# Altium PCB HIL_project.PcbDoc (part 3 of 3)
Units mm, origin at the board's own origin, x right, y up, seen from the top; angles counter-clockwise.
Board outline 165 x 120 mm, 2 copper layers (Top Layer, Bottom Layer); 116 components, 232 nets, 732 pads, 1218 vias.
Unrouted connection lines stored in the file: 107.
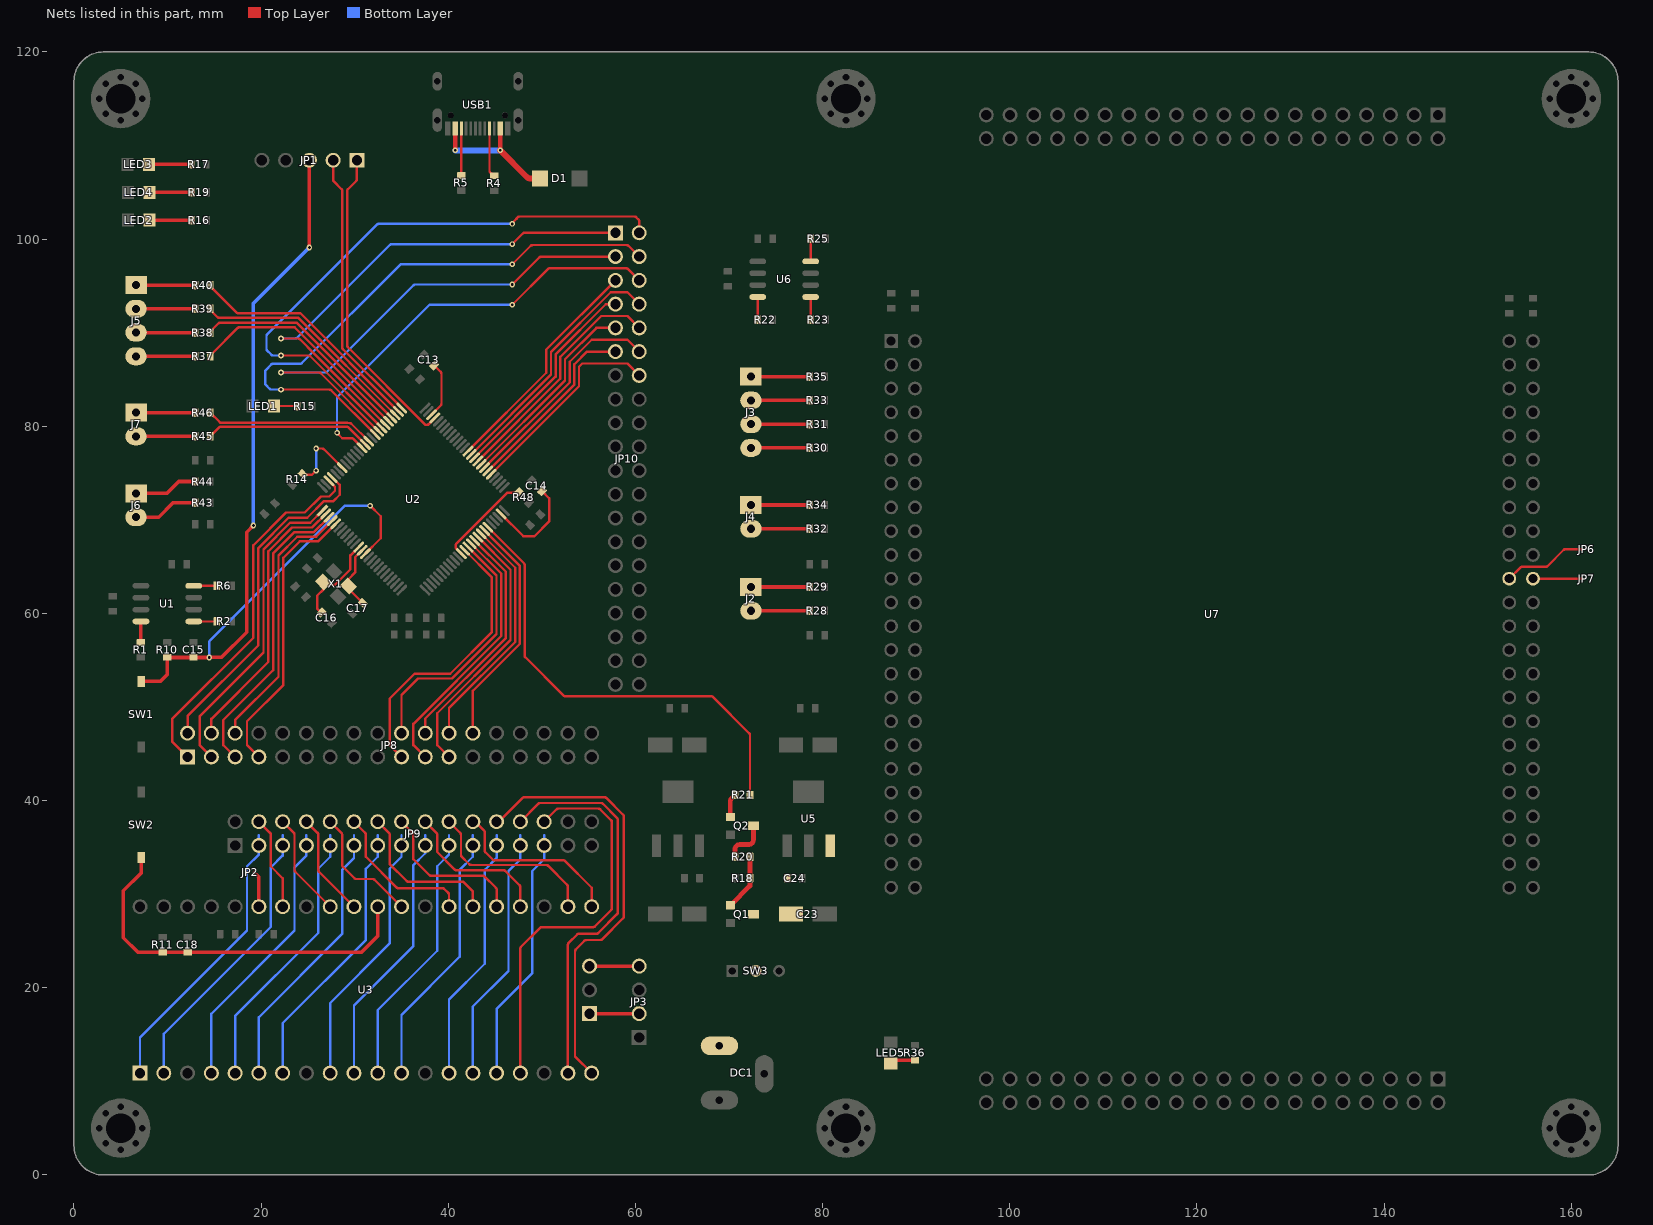
[diagram p3: the nets of this part, all layers, seen from the top]

## Via types
v1: diameter 0.6, hole 0.3, Top Layer to Bottom Layer, tented both sides, 1218 vias

## Nets (pads, with @x,y where several pads share a name; then routed paths per layer and width w, separated by ;. In a path a pad name is that pad's centre, name@x,y a point inside that pad or via, vN(x,y) a via of type N, cw(c..) or ccw(c..) an arc to the next point about the centre after c; other vN are vias at no path point) (continued)
HIL_PD0: JP10.1 U2.81 | length 55.3
  Top Layer w0.254: v1(22.123,89.383) 23.96,89.383 cw(c23.96,89.129) 24.14,89.308 25.765,87.683 U2.81@33.27,80.178 ; v1(46.838,99.466) 47.968,100.597 cw(c48.147,100.417) 47.995,100.62 cw(c48.147,100.417) 48.147,100.671 JP10.1@57.865,100.671
  Bottom Layer w0.254: v1(22.123,89.383) 23.669,89.383 ccw(c23.669,89.637) 23.822,89.433 ccw(c23.669,89.637) 23.848,89.456 33.784,99.393 cw(c33.963,99.212) 33.811,99.416 cw(c33.963,99.212) 33.963,99.466 v1(46.838,99.466)
HIL_PD1: JP10.40 U2.82 | length 63.9
  Top Layer w0.254: v1(22.123,87.562) 25.073,87.562 cw(c25.073,87.308) 25.253,87.488 U2.82@32.916,79.824 ; v1(46.838,101.625) cw(c47.091,101.614) 46.911,101.792 47.274,102.155 ccw(c47.094,102.335) 47.301,102.188 47.385,102.306 cw(c47.592,102.159) 47.592,102.413 59.89,102.413 cw(c59.89,102.159) 60.042,102.362 cw(c59.89,102.159) 60.069,102.339 60.331,102.076 cw(c60.151,101.897) 60.354,102.05 cw(c60.151,101.897) 60.405,101.897 JP10.40@60.405,100.671
  Bottom Layer w0.254: v1(22.123,87.562) 21.28,87.562 cw(c21.28,87.816) 21.128,87.613 cw(c21.28,87.816) 21.101,87.636 20.648,88.089 cw(c20.828,88.269) 20.574,88.269 20.574,89.633 cw(c20.828,89.633) 20.625,89.785 cw(c20.828,89.633) 20.648,89.813 32.387,101.552 cw(c32.566,101.371) 32.414,101.575 cw(c32.566,101.371) 32.566,101.625 v1(46.838,101.625)
HIL_PD2: JP10.2 U2.83 | length 53.9
  Top Layer w0.254: v1(22.123,85.742) 26.186,85.742 cw(c26.186,85.488) 26.366,85.668 U2.83@32.563,79.471 ; v1(46.838,95.148) 48.223,96.533 49.746,98.057 cw(c49.925,97.877) 49.773,98.08 cw(c49.925,97.877) 49.925,98.131 JP10.2@57.865,98.131
  Bottom Layer w0.254: v1(22.123,85.742) 26.861,85.742 ccw(c26.861,85.996) 27.014,85.793 ccw(c26.861,85.996) 27.04,85.816 36.299,95.075 cw(c36.478,94.894) 36.326,95.098 cw(c36.478,94.894) 36.478,95.148 v1(46.838,95.148)
HIL_PD3: JP10.39 U2.84 | length 61.4
  Top Layer w0.254: v1@22.14,83.922 27.3,83.922 cw(c27.3,83.668) 27.479,83.847 U2.84@32.209,79.117 ; v1(46.838,97.307) 48.818,99.288 cw(c48.997,99.108) 48.845,99.311 cw(c48.997,99.108) 48.997,99.362 59.069,99.362 cw(c59.069,99.108) 59.248,99.288 JP10.39@60.405,98.131
  Bottom Layer w0.254: 21.093,86.599 20.521,86.028 ccw(c20.701,85.848) 20.498,86.001 ccw(c20.701,85.848) 20.447,85.848 20.447,84.584 ccw(c20.701,84.586) 20.52,84.407 20.932,83.995 ccw(c21.111,84.176) 21.109,83.922 v1(22.123,83.922) ; 21.093,86.6 cw(c21.272,86.419) 21.119,86.622 cw(c21.272,86.419) 21.272,86.673 24.164,86.673 ccw(c24.164,86.927) 24.317,86.724 ccw(c24.164,86.927) 24.343,86.747 34.83,97.234 cw(c35.009,97.053) 34.856,97.257 cw(c35.009,97.053) 35.009,97.307 v1(46.838,97.307)
HIL_PD7: JP10.38 U2.88 | length 45.6
  Top Layer w0.254: v1(28.118,79.303) 28.118,79.273 28.677,78.715 28.782,78.715 29.678,78.715 cw(c29.678,78.461) 29.858,78.64 U2.88@30.795,77.703 ; v1(46.838,92.989) 50.65,96.802 ; 50.65,96.802 cw(c50.829,96.622) 50.677,96.825 cw(c50.829,96.622) 50.829,96.876 59.015,96.876 cw(c59.015,96.622) 59.195,96.801 JP10.38@60.405,95.591
  Bottom Layer w0.254: v1(28.118,79.303) 28.118,83.004 cw(c28.372,83.004) 28.169,83.156 cw(c28.372,83.004) 28.192,83.183 37.998,92.989 v1(46.838,92.989)
HIL_PD8: JP10.34 U2.55 | length 22.5
  Top Layer w0.254: U2.55@44.584,74.875 53.975,84.266 53.975,86.367 54.309,86.701 59.135,86.701 JP10.34@60.405,85.431
HIL_PD9: JP10.6 U2.56 | length 20.2
  Top Layer w0.254: U2.56@44.23,75.228 53.475,84.473 53.475,86.629 54.817,87.971 JP10.6@57.865,87.971
HIL_PD10: JP10.35 U2.57 | length 24
  Top Layer w0.254: U2.57@43.876,75.582 52.975,84.68 52.975,86.891 55.325,89.241 59.135,89.241 JP10.35@60.405,87.971
HIL_PD11: JP10.5 U2.58 | length 21.7
  Top Layer w0.254: U2.58@43.523,75.935 52.475,84.887 52.475,87.153 55.833,90.511 JP10.5@57.865,90.511
HIL_PD12: JP10.36 U2.59 | length 25.5
  Top Layer w0.254: U2.59@43.169,76.289 51.975,85.095 51.975,87.415 56.341,91.781 59.135,91.781 JP10.36@60.405,90.511
HIL_PD13: JP10.4 U2.60 | length 23.2
  Top Layer w0.254: U2.60@42.816,76.642 51.475,85.302 51.475,87.677 56.833,93.035 57.849,93.035 JP10.4@57.865,93.051
HIL_PD14: JP10.37 U2.61 | length 27.2
  Top Layer w0.254: U2.61@42.462,76.996 50.983,85.517 50.983,87.947 57.357,94.321 59.135,94.321 60.151,93.305 60.405,93.305 JP10.37@60.405,93.051
HIL_PD15: JP10.3 U2.62 | length 24.8
  Top Layer w0.254: U2.62@42.109,77.35 50.475,85.716 50.475,88.201 JP10.3@57.865,95.591
HIL_PE0: JP8.36 U2.97 | length 36.1
  Top Layer w0.254: JP8.36@12.145,47.204 12.145,49.027 19.709,56.591 19.709,66.986 22.939,70.216 24.935,70.216 26.716,71.998 27.726,71.998 28.401,72.673 28.401,73.733 U2.97@27.613,74.521
HIL_PE1: JP8.1 U2.98 | length 39.4
  Top Layer w0.254: JP8.1@12.145,44.664 10.494,46.315 10.494,48.728 19.174,57.408 19.174,67.287 22.669,70.781 24.673,70.781 26.392,72.5 27.285,72.5 27.893,73.108 27.893,73.52 27.259,74.154 U2.98@27.259,74.168
HIL_PE2: JP8.2 U2.1 | length 33.5
  Top Layer w0.254: JP8.2@14.685,44.664 13.456,45.893 13.456,49.023 20.253,55.82 20.253,66.84 23.094,69.681 25.248,69.681 U2.1@26.552,70.986
HIL_PE3: JP8.35 U2.2 | length 29.7
  Top Layer w0.254: JP8.35@14.685,47.204 14.685,48.728 20.765,54.808 20.765,66.628 23.314,69.177 25.45,69.177 U2.2@26.906,70.632
HIL_PE4: JP8.3 U2.3 | length 32.1
  Top Layer w0.254: JP8.3@17.225,44.664 15.955,45.934 15.955,48.601 21.285,53.931 21.285,66.413 23.564,68.692 25.659,68.692 27.246,70.278 U2.3@27.259,70.278
HIL_PE5: JP8.34 U2.4 | length 28.2
  Top Layer w0.254: JP8.34@17.225,47.204 17.225,48.601 21.859,53.235 21.859,66.175 23.872,68.188 25.876,68.188 U2.4@27.613,69.925
HIL_PE6: JP8.4 U2.5 | length 30.5
  Top Layer w0.254: JP8.4@19.765,44.664 18.495,45.934 18.495,48.474 22.388,52.367 22.388,65.956 24.125,67.693 26.088,67.693 U2.5@27.966,69.571
HIL_PE7: JP8.10 U2.38 | length 30.6
  Top Layer w0.254: JP8.10@35.005,44.664 33.735,45.934 33.735,50.887 36.402,53.554 40.212,53.554 44.657,57.999 44.657,63.841 U2.38@41.755,66.743
HIL_PE8: JP8.27 U2.39 | length 27.5
  Top Layer w0.254: JP8.27@35.005,47.204 35.005,51.268 36.783,53.046 40.411,53.046 45.157,57.792 45.157,64.048 U2.39@42.109,67.096
HIL_PE9: JP8.11 U2.40 | length 28.5
  Top Layer w0.254: JP8.11@37.545,44.664 36.275,45.934 36.275,48.203 45.657,57.585 45.657,64.255 U2.40@42.462,67.45
HIL_PE10: JP8.26 U2.41 | length 25.6
  Top Layer w0.254: JP8.26@37.545,47.204 37.545,48.766 46.157,57.378 46.157,64.462 U2.41@42.816,67.804
HIL_PE11: JP8.12 U2.42 | length 28.7
  Top Layer w0.254: JP8.12@40.085,44.664 38.815,45.934 38.815,49.329 46.657,57.171 46.657,64.669 U2.42@43.169,68.157
HIL_PE12: JP8.25 U2.43 | length 25.7
  Top Layer w0.254: JP8.25@40.085,47.204 40.085,49.891 47.157,56.963 47.157,64.877 U2.43@43.523,68.511
HIL_PE13: JP8.24 U2.44 | length 25.3
  Top Layer w0.254: JP8.24@42.625,47.204 42.625,51.724 47.657,56.756 47.657,65.084 U2.44@43.876,68.864
HIL_SPI3_CS: R40.1 U2.77 | length 25.8
  Top Layer w0.254: R40.1@14.556,95.089 14.758,94.766 17.376,92.148 ccw(c17.555,92.329) 17.553,92.075 24.201,92.075 U2.77@34.684,81.592
HIL_SPI3_MISO: R38.1 U2.79 | length 24.1
  Top Layer w0.254: R38.1@14.556,90.009 14.779,90.328 15.452,91.001 cw(c15.631,90.821) 15.479,91.024 cw(c15.631,90.821) 15.631,91.075 23.787,91.075 U2.79@33.977,80.885
HIL_SPI3_MOSI: R37.1 U2.80 | length 24.5
  Top Layer w0.254: R37.1@14.556,87.469 14.774,87.792 17.483,90.501 cw(c17.662,90.321) 17.509,90.524 cw(c17.662,90.321) 17.662,90.575 23.58,90.575 U2.80@33.623,80.532
HIL_SPI3_SCK: R39.1 U2.78 | length 24.5
  Top Layer w0.254: R39.1@14.556,92.549 14.773,92.226 15.351,91.648 ccw(c15.529,91.829) 15.528,91.575 23.994,91.575 U2.78@34.33,81.239
HIL_USART2_RX: R45.1 U2.87 | length 17.8
  Top Layer w0.254: R45.1@14.556,78.922 15.493,79.859 ; 15.494,79.86 cw(c15.672,79.679) 15.52,79.882 cw(c15.672,79.679) 15.672,79.933 29.167,79.933 cw(c29.167,79.679) 29.346,79.859 U2.87@31.148,78.057
HIL_USART2_TX: R46.1 U2.86 | length 18.2
  Top Layer w0.254: R46.1@14.556,81.462 15.579,80.439 ccw(c15.758,80.619) 15.758,80.365 29.167,80.365 cw(c29.167,79.679) 29.203,80.364 29.471,80.35 cw(c29.457,80.096) 29.636,80.277 cw(c29.457,80.096) 29.637,80.276 U2.86@31.502,78.41
NetC13_2: C13.2 U2.73 | length 6
  Top Layer w0.254: U2.73@38.22,81.239 38.22,81.242 39.221,82.244 ccw(c39.018,82.396) 39.272,82.396 39.272,85.631 ccw(c39.018,85.631) 39.198,85.81 C13.2@38.492,86.516
NetC14_2: C14.2 U2.49 | length 10.3
  Top Layer w0.254: U2.49@45.644,70.632 48.026,68.25 49.2,68.25 50.775,69.825 50.775,72.314 C14.2@50.02,73.069
NetC23_1: C23.1 C24.2 Q1.2 U5.3
NetD1_1: D1.1 USB1.A4 USB1.B4 | length 14.9
  Top Layer w0.508: v1(40.757,109.489) USB1.B4@40.757,111.799 ; v1@45.551,109.494 USB1.A4@45.551,111.793
  Top Layer w0.635: v1@45.551,109.494 v1(45.546,109.489) 48.41,106.625 ccw(c48.769,106.985) 48.769,106.477 D1.1@49.818,106.477
  Bottom Layer w0.635: v1(40.757,109.489) v1(45.546,109.489)
NetDC1_1: DC1.1 SW3.2
NetJ2_1: J2.1 R29.2 | length 6.3
  Top Layer w0.381: J2.1@72.343,62.825 R29.2@78.617,62.825
NetJ2_2: J2.2 R28.2 | length 6.3
  Top Layer w0.381: J2.2@72.343,60.285 R28.2@78.617,60.285
NetJ3_1: J3.1 R35.2 | length 6.3
  Top Layer w0.381: J3.1@72.343,85.304 R35.2@78.617,85.304
NetJ3_2: J3.2 R33.2 | length 6.3
  Top Layer w0.381: J3.2@72.343,82.764 R33.2@78.617,82.764
NetJ3_3: J3.3 R31.2 | length 6.3
  Top Layer w0.381: J3.3@72.343,80.224 R31.2@78.617,80.224
NetJ3_4: J3.4 R30.2 | length 6.3
  Top Layer w0.381: J3.4@72.343,77.684 R30.2@78.617,77.684
NetJ4_1: J4.1 R34.2 | length 6.3
  Top Layer w0.381: J4.1@72.343,71.588 R34.2@78.617,71.588
NetJ4_2: J4.2 R32.2 | length 6.3
  Top Layer w0.381: J4.2@72.343,69.048 R32.2@78.617,69.048
NetJ5_1: J5.1 R40.2 | length 6.3
  Top Layer w0.381: J5.1@6.644,95.089 R40.2@12.956,95.089
NetJ5_2: J5.2 R39.2 | length 6.3
  Top Layer w0.381: J5.2@6.644,92.549 R39.2@12.956,92.549
NetJ5_3: J5.3 R38.2 | length 6.3
  Top Layer w0.381: J5.3@6.644,90.009 R38.2@12.956,90.009
NetJ5_4: J5.4 R37.2 | length 6.3
  Top Layer w0.381: J5.4@6.644,87.469 R37.2@12.956,87.469
NetJ6_1: J6.1 R44.2 | length 6.8
  Top Layer w0.381: J6.1@6.644,72.826 9.946,72.826 11.216,74.096 R44.2@12.956,74.096
NetJ6_2: J6.2 R43.2 | length 6.9
  Top Layer w0.381: J6.2@6.644,70.286 9.057,70.286 10.581,71.81 R43.2@12.956,71.81
NetJ7_1: J7.1 R46.2 | length 6.3
  Top Layer w0.381: J7.1@6.644,81.462 R46.2@12.956,81.462
NetJ7_2: J7.2 R45.2 | length 6.3
  Top Layer w0.381: J7.2@6.644,78.922 R45.2@12.956,78.922
NetJP2_1: JP2.1 U3.35 | length 3.9
  Top Layer w0.381: JP2.1@19.257,32.345 19.765,31.837 U3.35@19.765,28.662
NetJP6_2: JP6.2 U7.69 | length 9.1
  Top Layer w0.254: U7.69@153.369,63.714 154.556,64.901 cw(c154.735,64.721) 154.583,64.924 cw(c154.735,64.721) 154.735,64.975 157.27,64.975 ccw(c157.27,65.229) 157.422,65.026 ccw(c157.27,65.229) 157.449,65.049 ; 157.449,65.049 159.201,66.801 cw(c159.38,66.621) 159.228,66.824 cw(c159.38,66.621) 159.38,66.875 JP6.2@161.21,66.875
NetJP7_1: JP7.1 U7.70 | length 5.3
  Top Layer w0.254: U7.70@155.909,63.714 JP7.1@161.21,63.714
NetLED1_1: LED1.1 R15.1 | length 2.5
  Top Layer w0.254: LED1.1@21.365,82.159 R15.1@23.867,82.159
NetLED2_1: LED2.1 R16.2 | length 4.5
  Top Layer w0.381: LED2.1@8.076,102.022 R16.2@12.585,102.022
NetLED3_1: LED3.1 R17.2 | length 4.5
  Top Layer w0.381: LED3.1@8.026,107.974 R17.2@12.535,107.974
NetLED4_1: LED4.1 R19.2 | length 4.5
  Top Layer w0.381: LED4.1@8.076,104.998 R19.2@12.585,104.998
NetLED5_1: LED5.1 R36.1 | length 2.7
  Top Layer w0.381: LED5.1@87.278,11.898 87.621,12.241 R36.1@89.869,12.241
NetQ1_1: Q1.1 R18.1 R20.1 | length 6.1
  Top Layer w0.508: Q1.1@70.153,28.825 70.178,28.825 72.241,30.887 R18.1@72.241,31.71 R20.1@72.241,33.996
NetQ2_2: Q2.2 R21.1 | length 2.5
  Top Layer w0.508: Q2.2@70.126,38.276 70.126,39.874 cw(c70.634,39.874) 70.274,40.233 R21.1@70.641,40.6
NetQ2_3: Q2.3 R20.2 | length 4.8
  Top Layer w0.508: R20.2@70.641,33.996 70.641,34.792 cw(c71.149,34.792) 71.149,35.3 72.095,35.3 ccw(c72.095,35.808) 72.603,35.808 Q2.3@72.603,37.298
NetR1_2: R1.2 U1.8 | length 2.2
  Top Layer w0.381: R1.2@7.161,56.894 U1.8@7.161,59.142
NetR2_1: R2.1 U1.1 | length 2.5
  Top Layer w0.254: U1.1@12.811,59.142 R2.1@15.282,59.142
NetR4_1: R4.1 USB1.A5 | length 5.3
  Top Layer w0.254: USB1.A5@44.407,111.799 44.407,107.297 ccw(c44.661,107.297) 44.481,107.118 44.607,106.992 R4.1@44.907,106.769
NetR5_1: R5.1 USB1.B5 | length 5
  Top Layer w0.254: R5.1@41.407,106.794 USB1.B5@41.407,111.799
NetR6_1: R6.1 U1.4 | length 2.5
  Top Layer w0.254: U1.4@12.811,62.952 R6.1@15.282,62.952
NetR14_1: R14.1 U2.94 | length 7.6
  Top Layer w0.254: R14.1@24.452,74.878 24.523,74.808 25.405,74.808 v1@25.857,75.26 ; v1(25.883,77.619) 26.531,77.619 cw(c26.531,77.365) 26.711,77.545 U2.94@28.674,75.582
  Bottom Layer w0.254: v1(25.883,75.26) v1(25.883,77.619)
NetR22_2: R22.2 U6.8 | length 2.4
  Top Layer w0.254: R22.2@73.074,91.4 U6.8@73.074,93.813
NetR23_1: R23.1 U6.1 | length 2.4
  Top Layer w0.254: R23.1@78.724,91.4 U6.1@78.724,93.813
NetR25_1: R25.1 U6.4 | length 2.4
  Top Layer w0.254: U6.4@78.724,97.623 R25.1@78.724,100.036
NetR48_2: R48.2 U2.37 | length 10.3
  Top Layer w0.254: U2.37@41.402,66.389 40.984,66.807 40.87,66.921 cw(c41.05,67.1) 40.796,67.1 40.796,67.288 cw(c41.05,67.288) 40.87,67.467 46.287,72.883 47.444,72.883 R48.2@47.515,72.954
NRST_HIL: C15.2 JP1.3 R10.2 SW1.2 U2.14 | length 98.9
  Top Layer w0.254: U2.14@31.148,66.389 32.791,68.032 32.791,70.383 v1@31.648,71.526
  Top Layer w0.381: SW1.2@7.192,52.736 9.255,52.736 9.986,53.467 R10.2@9.986,55.294 C15.2@12.78,55.294 14.451,55.294 v1(14.453,55.296) 15.748,55.296 18.459,58.006 18.459,68.674 v1(19.177,69.393) ; v1(25.16,99.099) 25.16,100.993 25.16,101.775 JP1.3@25.16,108.425
  Bottom Layer w0.254: v1(14.453,55.296) 14.453,56.918 cw(c14.707,56.918) 14.503,57.07 cw(c14.707,56.918) 14.526,57.097 28.857,71.427 cw(c29.036,71.247) 28.883,71.45 cw(c29.036,71.247) 29.036,71.501 v1(31.648,71.501)
  Bottom Layer w0.381: v1(19.177,69.393) 19.177,93.116 v1(25.16,99.099)
OSC0: C16.2 U2.12 X1.1 | length 10
  Top Layer w0.254: C16.2@26.438,60.089 25.988,60.539 25.988,61.892 26.717,62.621 26.646,62.692 X1.1@26.646,63.361 ; X1.1@26.802,63.29 27.386,63.29 27.603,63.073 27.887,63.073 29.544,64.73 29.544,66.199 U2.12@30.441,67.096
OSC1: C17.1 U2.13 X1.3 | length 6.9
  Top Layer w0.254: U2.13@30.795,66.743 30.052,66 30.052,64.382 29.305,63.634 29.305,62.799 29.364,62.74 29.364,62.613 C17.1@30.872,61.105
PI_GPIO0: JP9.2 U3.1 | length 30.7
  Bottom Layer w0.254: U3.1@7.065,10.882 7.065,14.692 18.495,26.122 18.495,32.98 19.765,34.25 19.765,36.282
PI_GPIO1: JP9.3 U3.2 | length 30.7
  Bottom Layer w0.254: U3.2@9.605,10.882 9.605,15.073 21.035,26.503 21.035,32.853 22.305,34.123 22.305,36.282
PI_GPIO2: JP9.4 U3.4 | length 29.6
  Bottom Layer w0.254: U3.4@14.685,10.882 14.685,17.232 23.575,26.122 23.575,32.853 24.845,34.123 24.845,36.282
PI_GPIO3: JP9.5 U3.5 | length 29.6
  Bottom Layer w0.254: U3.5@17.225,10.882 17.225,16.978 26.115,25.868 26.115,32.726 27.385,33.996 27.385,36.282
PI_GPIO4: JP9.6 U3.6 | length 29.6
  Bottom Layer w0.254: U3.6@19.765,10.882 19.765,16.851 28.655,25.741 28.655,32.599 29.925,33.869 29.925,36.282
PI_GPIO5: JP9.7 U3.7 | length 29.6
  Bottom Layer w0.254: U3.7@22.305,10.882 22.305,16.216 31.195,25.106 31.195,32.726 32.465,33.996 32.465,36.282
PI_GPIO6: JP9.8 U3.9 | length 28.6
  Bottom Layer w0.254: U3.9@27.385,10.882 27.385,18.375 33.735,24.725 33.735,32.726 35.005,33.996 35.005,36.282
PI_GPIO7: JP9.9 U3.10 | length 28.6
  Bottom Layer w0.254: U3.10@29.925,10.882 29.925,18.121 36.275,24.471 36.275,33.107 37.545,34.377 37.545,36.282
PI_GPIO8: JP9.10 U3.11 | length 28.6
  Bottom Layer w0.254: U3.11@32.465,10.882 32.465,17.613 38.815,23.963 38.815,32.98 40.085,34.25 40.085,36.282
PI_GPIO9: JP9.11 U3.12 | length 28.6
  Bottom Layer w0.254: U3.12@35.005,10.882 35.005,17.105 41.215,23.315 41.215,32.586 42.625,33.996 42.625,36.282
PI_GPIO10: JP9.12 U3.14 | length 27.5
  Bottom Layer w0.254: U3.14@40.085,10.882 40.085,18.756 43.895,22.566 43.895,32.599 45.165,33.869 45.165,36.282
PI_GPIO11: JP9.13 U3.15 | length 27.5
  Bottom Layer w0.254: U3.15@42.625,10.882 42.625,17.994 46.435,21.804 46.435,32.472 47.705,33.742 47.705,36.282
PI_GPIO12: JP9.14 U3.16 | length 27.5
  Bottom Layer w0.254: U3.16@45.165,10.882 45.165,17.74 48.959,21.534 48.959,32.456 50.245,33.742 50.245,36.282
PI_GPIO13: JP9.19 U3.17 | length 42.6
  Top Layer w0.254: U3.17@47.705,10.882 47.705,24.2 cw(c47.959,24.2) 47.756,24.352 cw(c47.959,24.2) 47.779,24.379 49.801,26.401 ; 49.801,26.401 cw(c49.98,26.221) 49.828,26.424 cw(c49.98,26.221) 49.98,26.475 55.47,26.475 ccw(c55.47,26.729) 55.622,26.526 ccw(c55.47,26.729) 55.649,26.549 57.41,28.31 ccw(c57.23,28.489) 57.433,28.337 ccw(c57.23,28.489) 57.484,28.489 57.484,37.711 ccw(c57.23,37.711) 57.433,37.863 ccw(c57.23,37.711) 57.41,37.89 56.224,39.076 ccw(c56.045,38.896) 56.045,39.15 51.753,39.15 ccw(c51.753,38.896) 51.601,39.099 ccw(c51.753,38.896) 51.574,39.076 JP9.19@50.245,37.747
PI_GPIO14: JP9.20 U3.19 | length 42.5
  Top Layer w0.254: JP9.20@47.705,37.747 49.634,39.676 cw(c49.813,39.496) 49.661,39.699 cw(c49.813,39.496) 49.813,39.75 56.32,39.75 cw(c56.32,39.496) 56.499,39.676 58.045,38.13 cw(c57.865,37.951) 58.068,38.103 cw(c57.865,37.951) 58.119,37.951 58.119,28.049 cw(c57.865,28.049) 58.068,27.897 cw(c57.865,28.049) 58.045,27.87 56.024,25.849 cw(c55.845,26.029) 55.997,25.826 cw(c55.845,26.029) 55.845,25.775 53.955,25.775 ccw(c53.955,25.521) 53.803,25.724 ccw(c53.955,25.521) 53.776,25.701 52.859,24.784 ccw(c53.039,24.605) 52.836,24.757 ccw(c53.039,24.605) 52.785,24.605 U3.19@52.785,10.882
PI_GPIO15: JP9.21 U3.20 | length 46.8
  Top Layer w0.254: JP9.21@45.165,37.747 45.292,37.747 ccw(c45.292,38.001) 45.471,37.821 47.926,40.276 cw(c48.105,40.096) 47.953,40.299 cw(c48.105,40.096) 48.105,40.35 56.72,40.35 cw(c56.72,40.096) 56.899,40.276 58.68,38.495 cw(c58.5,38.316) 58.703,38.468 cw(c58.5,38.316) 58.754,38.316 58.754,27.609 cw(c58.5,27.609) 58.703,27.457 cw(c58.5,27.609) 58.68,27.43 56.424,25.174 cw(c56.245,25.354) 56.397,25.151 cw(c56.245,25.354) 56.245,25.1 54.73,25.1 ccw(c54.73,24.846) 54.578,25.049 ccw(c54.73,24.846) 54.551,25.026 53.621,24.096 ccw(c53.801,23.917) 53.598,24.069 ccw(c53.801,23.917) 53.547,23.917 53.547,12.66 U3.20@55.325,10.882
PI_GPIO16: JP9.22 U3.21 | length 18.9
  Top Layer w0.254: JP9.22@42.625,37.747 42.773,37.747 cw(c42.773,37.493) 42.952,37.673 43.821,36.804 cw(c43.641,36.625) 43.844,36.777 cw(c43.641,36.625) 43.895,36.625 43.895,34.66 ccw(c44.149,34.66) 43.946,34.508 ccw(c44.149,34.66) 43.969,34.481 44.75,33.7 ; 44.751,33.699 ccw(c44.93,33.879) 44.778,33.676 ccw(c44.93,33.879) 44.929,33.625 52.29,33.624 cw(c52.29,33.37) 52.469,33.55 55.325,30.694 U3.21@55.325,28.662
PI_GPIO17: JP9.23 U3.22 | length 19.1
  Top Layer w0.254: JP9.23@40.085,37.747 41.281,36.551 cw(c41.101,36.372) 41.304,36.524 cw(c41.101,36.372) 41.355,36.372 41.355,34.2 ccw(c41.609,34.2) 41.406,34.048 ccw(c41.609,34.2) 41.429,34.021 42.251,33.199 ccw(c42.43,33.379) 42.278,33.176 ccw(c42.43,33.379) 42.43,33.125 50.47,33.125 cw(c50.47,32.871) 50.622,33.074 cw(c50.47,32.871) 50.649,33.051 52.711,30.989 cw(c52.531,30.81) 52.734,30.962 cw(c52.531,30.81) 52.785,30.81 U3.22@52.785,28.662
PI_GPIO18: JP9.24 U3.24 | length 16.3
  Top Layer w0.254: JP9.24@37.545,37.747 38.741,36.551 cw(c38.561,36.372) 38.764,36.524 cw(c38.561,36.372) 38.815,36.372 38.815,34.504 40.67,32.649 ccw(c40.849,32.829) 40.849,32.575 45.895,32.575 cw(c45.895,32.321) 46.047,32.524 cw(c45.895,32.321) 46.074,32.501 47.631,30.944 cw(c47.451,30.765) 47.705,30.767 cw(c47.451,30.765) 47.705,30.765 U3.24@47.705,28.662
PI_GPIO19: JP9.25 U3.25 | length 16.6
  Top Layer w0.254: JP9.25@35.005,37.747 36.201,36.551 cw(c36.021,36.372) 36.224,36.524 cw(c36.021,36.372) 36.275,36.372 36.275,33.742 37.968,32.049 37.969,32.048 ccw(c38.147,32.229) 37.97,32.047 ccw(c38.147,32.229) 38.147,31.975 43.695,31.975 cw(c43.695,31.721) 43.847,31.924 cw(c43.695,31.721) 43.874,31.901 45.091,30.684 cw(c44.911,30.505) 45.114,30.657 cw(c44.911,30.505) 45.165,30.506 cw(c44.911,30.504) 45.165,30.505 U3.25@45.165,28.662
PI_GPIO20: JP9.26 U3.26 | length 16.8
  Top Layer w0.254: JP9.26@32.465,37.747 33.661,36.551 cw(c33.481,36.372) 33.684,36.524 cw(c33.481,36.372) 33.735,36.372 33.735,33.234 35.57,31.399 ccw(c35.749,31.579) 35.749,31.325 41.52,31.325 cw(c41.52,31.071) 41.672,31.274 cw(c41.52,31.071) 41.699,31.251 42.551,30.399 cw(c42.371,30.22) 42.625,30.222 cw(c42.371,30.22) 42.625,30.22 U3.26@42.625,28.662
PI_GPIO21: JP9.27 U3.27 | length 16.1
  Top Layer w0.254: JP9.27@29.925,37.747 31.121,36.551 cw(c30.941,36.372) 31.144,36.524 cw(c30.941,36.372) 31.195,36.372 31.195,33.996 34.467,30.724 ccw(c34.646,30.904) 34.646,30.65 39.37,30.65 cw(c39.37,30.396) 39.522,30.599 cw(c39.37,30.396) 39.549,30.576 40.011,30.114 cw(c39.831,29.935) 40.085,29.937 cw(c39.831,29.934) 40.085,29.935 U3.27@40.085,28.662
PI_GPIO22: JP9.28 U3.29 | length 13.4
  Top Layer w0.254: JP9.28@27.385,37.747 28.581,36.551 cw(c28.401,36.372) 28.604,36.524 cw(c28.401,36.372) 28.655,36.372 28.655,33.124 ccw(c28.909,33.125) 28.728,32.947 29.977,31.698 ccw(c30.155,31.879) 30.154,31.625 31.937,31.625 cw(c31.937,31.371) 32.089,31.574 cw(c31.937,31.371) 32.116,31.551 U3.29@35.005,28.662
PI_GPIO26_ADC0: JP9.29 U3.31 | length 11.2
  Top Layer w0.254: JP9.29@24.845,37.747 26.041,36.551 cw(c25.861,36.372) 26.064,36.524 cw(c25.861,36.372) 26.115,36.372 26.115,32.577 ccw(c26.369,32.577) 26.166,32.425 ccw(c26.369,32.577) 26.189,32.398 U3.31@29.925,28.662
PI_GPIO27_ADC1: JP9.30 U3.32 | length 11.2
  Top Layer w0.254: JP9.30@22.305,37.747 23.501,36.551 cw(c23.321,36.372) 23.524,36.524 cw(c23.321,36.372) 23.575,36.372 23.575,32.577 ccw(c23.829,32.577) 23.626,32.425 ccw(c23.829,32.577) 23.649,32.398 U3.32@27.385,28.662
PI_GPIO28_ADC2: JP9.31 U3.34 | length 10.1
  Top Layer w0.254: JP9.31@19.765,37.747 20.961,36.551 cw(c20.781,36.372) 20.984,36.524 cw(c20.781,36.372) 21.035,36.372 21.035,32.98 22.305,31.71 U3.34@22.305,28.662
PI_NRST: C18.2 R11.2 SW2.2 U3.30 | length 41
  Top Layer w0.381: SW2.2@7.192,33.925 7.192,32.258 5.287,30.353 5.287,25.36 6.849,23.798 R11.2@9.478,23.798 C18.2@12.145,23.798 30.732,23.798 32.465,25.531 U3.30@32.465,28.662
PI_SWCLK: JP3.2 U3.D1 | length 5.3
  Top Layer w0.381: U3.D1@55.095,17.232 JP3.2@60.405,17.232
PI_SWDIO: JP3.4 U3.D3 | length 5.3
  Top Layer w0.381: U3.D3@55.095,22.312 JP3.4@60.405,22.312
Power_on: R21.2 U2.45 | length 49.4
  Top Layer w0.254: U2.45@44.23,69.218 48.09,65.358 cw(c47.91,65.178) 48.164,65.178 48.164,55.495 ccw(c48.418,55.497) 48.238,55.318 52.33,51.226 ; 52.331,51.225 ccw(c52.509,51.406) 52.509,51.152 68.098,51.152 cw(c68.098,50.898) 68.277,51.077 72.167,47.187 cw(c71.987,47.008) 72.19,47.161 cw(c71.987,47.008) 72.241,47.008 R21.2@72.241,40.6
SWCLK: JP1.2 U2.76 | length 29.5
  Top Layer w0.254: JP1.2@27.7,108.425 27.7,106.332 ccw(c27.954,106.332) 27.775,106.152 28.602,105.325 cw(c28.422,105.146) 28.625,105.299 cw(c28.422,105.146) 28.676,105.146 28.676,88.413 ccw(c28.93,88.413) 28.726,88.261 ccw(c28.93,88.413) 28.749,88.234 34.62,82.363 U2.76@35.038,81.946
SWDIO: JP1.1 U2.72 | length 33.4
  Top Layer w0.254: JP1.1@30.24,108.425 30.24,106.393 cw(c29.986,106.393) 30.189,106.24 cw(c29.986,106.393) 30.166,106.214 29.274,105.321 ccw(c29.454,105.142) 29.251,105.295 ccw(c29.454,105.142) 29.2,105.142 29.2,88.63 ccw(c29.454,88.63) 29.273,88.452 37.521,80.204 ccw(c37.7,80.385) 37.879,80.205 38.518,80.843 cw(c38.696,80.663) U2.72@38.573,80.885
pads on no net: H1.1 H2.1 H3.1 H4.1 H5.1 H6.1 SW3.3 U1.5 U3.37 U3.39 U3.40 U4.2 U6.5 U7.5 U7.6 U7.49 U7.50 U7.51 U7.52 USB1.A8 USB1.B8

## Polygon pours and split planes (outlines as drawn)
GND on Bottom Layer "GND_L02_P001" (solid, pour order 1): 0,3.15 0,116.85 cw(c3.15,116.85) 3.15,120 161.85,120 cw(c161.85,116.85) 165,116.85 165,3.15 cw(c161.85,3.15) 161.85,0 3.15,0 cw(c3.15,3.15)
GND on Top Layer "GND_L01_P000" (solid, pour order 0): 0,3.15 0,116.85 cw(c3.15,116.85) 3.15,120 161.85,120 cw(c161.85,116.85) 165,116.85 165,3.15 cw(c161.85,3.15) 161.85,0 3.15,0 cw(c3.15,3.15)

## Keep-outs
Keep-Out Layer:
  the board outline again, w0.5

## Other copper
Top Layer:
  region net +5: 64.975,22.225 ccw(c66.025,22.225) 66.025,21.175 71,21.175 71,26.825 ccw(c70.4,26.825) 70.4,27.425 68.55,27.425 cw(c68.55,28.4) 67.575,28.4 67.575,37.009 ccw(c66.631,37.009) 67.298,37.677 66.727,38.248 ccw(c65.938,37.46) 65.938,38.575 62.827,38.575 cw(c62.827,39.943) 61.859,38.976 58.597,42.238 ccw(c56.94,40.582) 56.939,42.925 53.425,42.925 51.775,42.925 cw(c51.775,43.525) 51.175,43.525 51.175,47.648 ccw(c50.548,47.648) 50.548,48.275 49.924,48.275 ccw(c49.924,47.676) 49.325,47.676 49.325,42.329 ccw(c50.379,42.329) 50.379,41.275 53.425,41.275 56.149,41.275 cw(c56.15,39.222) 57.602,40.673 60.86,37.415 ccw(c61.841,38.397) 61.841,37.009 65.834,37.009 cw(c65.834,36.688) 66.06,36.915 66.194,36.781 cw(c65.819,36.405) 66.35,36.405 66.35,33.675 66.35,30.922 cw(c65.392,30.922) 66.069,30.244 65.259,29.434 ccw(c65.944,28.749) 64.975,28.749
  region net "+3.3 HIL": 46.552,43.7 47.872,43.7 ccw(c47.872,44.403) 48.575,44.403 48.575,48.048 cw(c49.295,48.048) 49.295,48.768 60.092,48.768 cw(c60.092,47.491) 61.369,47.491 61.369,44.266 ccw(c62.178,44.266) 61.606,43.694 62.74,42.56 cw(c62.369,42.189) 62.894,42.188 62.894,39.76 66.194,39.76 66.194,41.965 ccw(c65.31,41.965) 65.935,42.59 64.256,44.269 cw(c64.828,44.841) 64.019,44.841 64.019,49.971 ccw(c63.546,49.971) 63.546,50.444 45.644,50.444 ccw(c45.644,49.105) 44.304,49.105 44.304,46.379 cw(c43.475,46.379) 43.475,45.55 42.05,45.55 ccw(c42.05,45.217) 41.717,45.217 41.717,44.073 ccw(c42.091,44.073) 42.091,43.7 43.669,43.7 cw(c43.669,43.143) 44.063,43.537 44.575,43.025 45.55,43.025 45.994,43.469 cw(c46.551,42.911)
  region net "+3.3 DUT": 87.133,85.75 90.085,85.75 ccw(c90.085,86.308) 90.643,86.308 90.643,91.322 cw(c91.357,91.322) 90.852,91.827 91.657,92.632 90.643,92.632 90.643,92.95 86.903,92.95 ccw(c86.903,92.637) 86.59,92.637 86.59,86.293 ccw(c87.133,86.293)
  region net "+3.3 DUT": 78.005,35.167 79.005,35.167 79.005,39.037 cw(c79.735,39.037) 79.735,39.767 80.155,39.767 80.155,42.16 ccw(c79.527,42.16) 79.971,42.604 78.129,44.446 cw(c78.581,44.898) 77.942,44.898 77.942,46.868 77.942,50.327 77.242,50.327 77.242,49.62 cw(c76.709,49.62) 77.086,49.243 75.433,47.589 ccw(c75.681,47.341) 75.33,47.341 75.33,44.082 ccw(c76.272,44.082) 75.606,43.416 76.595,42.426 cw(c75.97,41.8) 76.855,41.8 76.855,39.767 77.095,39.767 cw(c77.096,38.857) 78.005,38.857
  region net NetC23_1: 80.628,32.803 81.197,33.372 ccw(c80.936,33.633) 81.305,33.633 81.305,36.36 80.305,36.36 80.305,34.109 cw(c79.944,34.109) 80.199,33.854 79.873,33.528 cw(c79.564,33.837) 79.564,33.4 76.956,33.4 ccw(c76.956,32.963) 76.647,33.272 75.953,32.578 ccw(c76.19,32.341) 75.855,32.341 75.855,29.21 cw(c75.32,29.21) 75.32,28.675 72.275,28.675 ccw(c72.275,28.404) 72.003,28.403 72.003,27.347 ccw(c72.275,27.346) 72.275,27.075 77.93,27.075 77.93,28.675 77.3,28.675 cw(c77.3,29.239) 76.736,29.239 76.736,31.995 cw(c77.135,31.995) 76.853,32.277 77.166,32.59 cw(c77.371,32.385) 77.371,32.675 80.319,32.675 ccw(c80.319,33.112)
  region net NetDC1_1: 71.175,13.575 71.175,15.525 cw(c71.85,15.525) 71.85,16.2 72.625,16.2 ccw(c72.625,17.125) 73.55,17.125 73.55,22 ccw(c73.075,22) 73.075,22.475 72.55,22.475 ccw(c72.55,22) 72.075,22 72.075,19.35 cw(c71.325,19.35) 71.325,18.6 67.65,18.6 ccw(c67.65,17.65) 66.7,17.65 66.7,13.575 ccw(c67.5,13.575) 67.5,12.775 70.375,12.775 ccw(c70.375,13.575)
Bottom Layer:
  region net "+3.3 DUT": 90.643,85.75 110.629,85.75 cw(c110.629,84.244) 111.694,85.309 115.859,81.143 ccw(c116.878,82.161) 116.878,80.721 144.312,80.721 cw(c144.312,79.77) 145.263,79.77 145.263,78.414 146.233,78.414 146.233,79.914 cw(c147.041,79.914) 147.041,80.721 156.181,80.721 ccw(c156.181,81.36) 156.82,81.36 156.82,84.169 ccw(c156.1,84.169) 156.1,84.888 119.685,84.888 cw(c119.685,86.228) 118.736,85.28 114.218,89.799 ccw(c113.139,88.72) 113.139,90.246 90.643,90.246
  region net "+3.3 DUT": 87.133,85.75 90.643,85.75 90.643,90.246 87.096,90.246 ccw(c87.096,89.74) 86.59,89.74 86.59,86.293 ccw(c87.133,86.293)

## Silkscreen, mask and mechanical layers (free items; w line width, h text height)
Top Overlay:
  drawing of 138 lines, arcs and shapes, not listed
  text "PB10" at 97.941,114.908 h1.5 r90
  text "PE14" at 100.48,114.908 h1.5 r90
  text "PE12" at 103.029,114.908 h1.5 r90
  text "PE10" at 105.561,114.908 h1.5 r90
  text "PE8" at 108.1,114.908 h1.5 r90
  text "PB1" at 110.641,114.908 h1.5 r90
  text "PC5" at 113.179,114.908 h1.5 r90
  text "PA7" at 115.721,114.908 h1.5 r90
  text "PA5" at 118.251,114.908 h1.5 r90
  text "PA3" at 120.801,114.908 h1.5 r90
  text "PA1" at 123.341,114.908 h1.5 r90
  text "PC3" at 125.881,114.908 h1.5 r90
  text "PC1" at 128.42,114.908 h1.5 r90
  text "PC13" at 130.961,114.908 h1.5 r90
  text "PE5" at 133.491,114.908 h1.5 r90
  text "PE3" at 136.041,114.908 h1.5 r90
  text "GND" at 138.61,114.907 h1.6 r90
  text "GND" at 141.15,114.907 h1.6 r90
  text "GND" at 143.69,114.907 h1.6 r90
  text "GND" at 146.23,114.907 h1.6 r90
  text "5V" at 2.179,107.498 h1.6
  text "PE9" at 105.561,106.82 h1.5 r90
  text "PE7" at 108.101,106.816 h1.5 r90
  text "PE6" at 130.959,106.802 h1.5 r90
  text "PE4" at 133.499,106.786 h1.5 r90
  text "PE2" at 136.049,106.797 h1.5 r90
  text "PC2" at 125.88,106.733 h1.5 r90
  text "PC0" at 128.421,106.744 h1.5 r90
  text "PB0" at 110.641,106.721 h1.5 r90
  text "PC4" at 113.18,106.722 h1.5 r90
  text "PA6" at 115.719,106.716 h1.5 r90
  text "PA2" at 120.809,106.711 h1.5 r90
  text "PA0" at 123.341,106.722 h1.5 r90
  text "PA4" at 118.259,106.7 h1.5 r90
  text "GND" at 138.61,106.166 h1.6 r90
  text "GND" at 141.15,106.166 h1.6 r90
  text "GND" at 143.69,106.166 h1.6 r90
  text "GND" at 146.23,106.166 h1.6 r90
  text "PE11" at 103.021,106.045 h1.5 r90
  text "PE15" at 97.932,106.027 h1.5 r90
  text "PE13" at 100.481,106.028 h1.5 r90
  text "3V3" at 1.789,104.512 h1.6
  text "3V3" at 20.562,104.227 h1.6 r90
  text "GND" at 23.101,103.753 h1.6 r90
  text "DUT" at 10.872,103.647 h1.6 r90
  text "NRST" at 25.642,103.146 h1.6 r90
  text "SWCLK" at 28.181,101.941 h1.6 r90
  text "SWDIO" at 30.722,101.904 h1.6 r90
  text "3V3" at 1.789,101.536 h1.6
  text "HIL" at 10.882,100.869 h1.6 r90
  text "0" at 55.54,100.189 h1.6
  text "1" at 61.97,100.188 h1.6
  text "2" at 55.576,97.64 h1.6
  text "3" at 61.97,97.649 h1.6
  text "15" at 54.783,95.119 h1.6
  text "7" at 61.97,95.109 h1.6
  text "CS" at 16.073,94.608 h1.6
  text "(PA15)" at 16.073,93.741 h1
  text "13" at 54.784,92.569 h1.6
  text "14" at 61.97,92.57 h1.6
  text "SCK" at 16.073,92.068 h1.6
  text "Designed by SAMY VE & VY TRAN" at 25.056,91.802 h1.8
  text "PORT-D" at 54.277,91.772 h1.6 r90
  text "(PC10)" at 16.073,91.2 h1
  text "PORT-D" at 64.957,90.502 h1.6 r90
  text "11" at 54.793,90.028 h1.6
  text "12" at 61.97,90.02 h1.6
  text "MISO" at 16.073,89.527 h1.6
  text "(PC11)" at 16.073,88.66 h1
  text "9" at 55.165,87.488 h1.6
  text "10" at 61.97,87.489 h1.6
  text "MOSI" at 16.073,86.987 h1.6
  text "(PC12)" at 16.073,86.12 h1
  text "15" at 54.783,84.959 h1.6
  text "8" at 61.97,84.95 h1.6
  text "CS" at 67.684,84.823 h1.6
  text "(PD0)" at 66.982,83.982 h1
  text "13" at 54.784,82.409 h1.6
  text "14" at 61.97,82.41 h1.6
  text "SCK" at 66.721,82.283 h1.6
  text "(PC12)" at 66.529,81.442 h1
  text "TX" at 15.697,80.98 h1.6
  text "(PD5)" at 15.379,80.134 h1
  text "11" at 54.793,79.868 h1.6
  text "12" at 61.97,79.86 h1.6
  text "MISO" at 65.799,79.742 h1.6
  text "(PC11)" at 66.529,78.902 h1
  text "RX" at 15.697,78.44 h1.6
  text "(PD6)" at 15.379,77.594 h1
  text "5" at 55.195,77.339 h1.6
  text "10" at 61.97,77.329 h1.6
  text "MOSI" at 65.817,77.202 h1.6
  text "PORT-B" at 54.277,76.561 h1.6 r90
  text "(PC10)" at 66.529,76.362 h1
  text "PORT-B" at 64.957,75.307 h1.6 r90
  text "3" at 55.186,74.789 h1.6
  text "4" at 61.97,74.79 h1.6
  text "SDA" at 15.697,73.614 h1.6
  text "(PB6)" at 15.901,72.768 h1
  text "1" at 55.265,72.248 h1.6
  text "0" at 61.97,72.249 h1.6
  text "SCL" at 15.697,71.329 h1.6
  text "RX" at 66.859,71.106 h1.6
  text "(PB7)" at 15.901,70.482 h1
  text "(PA10)" at 66.335,70.266 h1
  text "14" at 54.766,69.71 h1.6
  text "15" at 61.97,69.719 h1.6
  text "TX" at 66.884,68.566 h1.6
  text "(PA9)" at 66.598,67.726 h1
  text "9" at 55.165,67.168 h1.6
  text "13" at 61.97,67.169 h1.6
  text "7" at 55.192,64.629 h1.6
  text "8" at 61.97,64.63 h1.6
  text "SDA" at 66.394,62.343 h1.6
  text "5" at 55.195,62.099 h1.6
  text "6" at 61.97,62.09 h1.6
  text "(PC9)" at 66.605,61.503 h1
  text "PORT-C" at 54.277,61.346 h1.6 r90
  text "PORT-C" at 64.957,60.082 h1.6 r90
  text "SCL" at 66.538,59.804 h1.6
  text "3" at 55.186,59.549 h1.6
  text "4" at 61.97,59.55 h1.6
  text "(PA8)" at 66.598,58.963 h1
  text "1" at 55.265,57.008 h1.6
  text "2" at 61.97,57 h1.6
  text "GND" at 52.974,54.47 h1.6
  text "0" at 61.97,54.469 h1.6
  text "GND" at 52.974,51.93 h1.6
  text "GND" at 61.97,51.93 h1.6
  text "PORT-E" at 12.24,50.792 h1.6
  text "PORT-E" at 36.37,50.792 h1.6
  text "PORT-A" at 23.59,50.66 h1.6
  text "0" at 11.773,49.054 h1.6
  text "3" at 14.327,49.054 h1.6
  text "5" at 16.872,49.064 h1.6
  text "0" at 19.393,49.054 h1.6
  text "4" at 24.451,49.055 h1.6
  text "6" at 27.017,49.055 h1.6
  text "8" at 29.551,49.048 h1.6
  text "10" at 31.71,49.047 h1.6
  text "0" at 34.633,49.054 h1.6
  text "3" at 37.187,49.054 h1.6
  text "5" at 39.732,49.064 h1.6
  text "13" at 41.876,49.054 h1.6
  text "3V3" at 45.208,49.054 h1.6
  text "5V" at 49.409,49.064 h1.6
  text "GND" at 52.591,49.055 h1.6
  text "2" at 21.958,49.038 h1.6
  text "RESET HIL" at 4.317,45.77 h1.6 r90
  text "5" at 27.032,41.861 h1.6
  text "5V" at 49.409,41.861 h1.6
  text "1" at 11.827,41.85 h1.6
  text "2" at 14.324,41.848 h1.6
  text "4" at 16.831,41.852 h1.6
  text "6" at 19.397,41.852 h1.6
  text "1" at 21.987,41.85 h1.6
  text "3" at 24.481,41.857 h1.6
  text "7" at 29.57,41.85 h1.6
  text "9" at 32.097,41.85 h1.6
  text "7" at 34.65,41.85 h1.6
  text "9" at 37.177,41.85 h1.6
  text "11" at 39.345,41.85 h1.6
  text "3V3" at 43.938,41.85 h1.6
  text "GND" at 52.591,41.852 h1.6
  text "15" at 44.415,39.602 h1.6
  text "28" at 18.984,39.586 h1.6
  text "27" at 21.533,39.577 h1.6
  text "26" at 24.072,39.594 h1.6
  text "22" at 26.609,39.583 h1.6
  text "21" at 29.17,39.583 h1.6
  text "20" at 31.688,39.586 h1.6
  text "19" at 34.256,39.591 h1.6
  text "18" at 36.785,39.593 h1.6
  text "17" at 39.334,39.591 h1.6
  text "16" at 41.867,39.594 h1.6
  text "14" at 46.938,39.593 h1.6
  text "13" at 49.496,39.592 h1.6
  text "3V3" at 12.933,37.265 h1.6
  text "3V3" at 12.933,34.725 h1.6
  text "RESET PI" at 4.317,34.432 h1.6 r90
  text "5" at 32.105,32.41 h1.6
  text "0" at 20.123,32.404 h1.6
  text "1" at 21.98,32.399 h1.6
  text "2" at 24.491,32.384 h1.6
  text "3" at 27.027,32.393 h1.6
  text "4" at 29.531,32.395 h1.6
  text "6" at 34.637,32.395 h1.6
  text "7" at 37.19,32.393 h1.6
  text "8" at 39.704,32.394 h1.6
  text "9" at 42.257,32.393 h1.6
  text "10" at 44.41,32.393 h1.6
  text "11" at 46.965,32.393 h1.6
  text "12" at 49.484,32.384 h1.6
  text "3V3" at 146.231,12.143 h1.6 r90
  text "PD9" at 97.941,11.907 h1.5 r90
  text "PD11" at 100.481,11.907 h1.5 r90
  text "PD13" at 103.021,11.907 h1.5 r90
  text "PD15" at 105.552,11.907 h1.5 r90
  text "PC7" at 108.1,11.907 h1.5 r90
  text "PA11" at 110.641,11.907 h1.5 r90
  text "PA15" at 113.172,11.907 h1.5 r90
  text "PD2" at 115.729,11.907 h1.5 r90
  text "PD4" at 118.259,11.907 h1.5 r90
  text "PD6" at 120.799,11.907 h1.5 r90
  text "PB3" at 123.341,11.907 h1.5 r90
  text "PB6" at 125.879,11.907 h1.5 r90
  text "PE0" at 128.421,11.907 h1.5 r90
  text "PB12" at 130.969,11.907 h1.5 r90
  text "PB14" at 133.5,11.907 h1.5 r90
  text "GND" at 136.07,11.907 h1.6 r90
  text "GND" at 138.61,11.907 h1.6 r90
  text "GND" at 141.15,11.907 h1.6 r90
  text "GND" at 143.69,11.907 h1.6 r90
  text "PE1" at 128.421,3.865 h1.5 r90
  text "PC6" at 105.559,3.768 h1.5 r90
  text "PC8" at 108.1,3.765 h1.5 r90
  text "PB5" at 123.331,3.76 h1.5 r90
  text "PB7" at 125.881,3.759 h1.5 r90
  text "PD1" at 113.181,3.689 h1.5 r90
  text "PD3" at 115.721,3.673 h1.5 r90
  text "PD5" at 118.251,3.671 h1.5 r90
  text "PD7" at 120.801,3.67 h1.5 r90
  text "3V3" at 146.231,3.403 h1.6 r90
  text "GND" at 136.07,3.166 h1.6 r90
  text "GND" at 138.61,3.166 h1.6 r90
  text "GND" at 141.15,3.166 h1.6 r90
  text "GND" at 143.69,3.166 h1.6 r90
  text "PB11" at 130.961,2.987 h1.5 r90
  text "PB13" at 133.501,2.971 h1.5 r90
  text "PA12" at 110.649,2.95 h1.5 r90
  text "PD10" at 97.941,2.871 h1.5 r90
  text "PD12" at 100.489,2.86 h1.5 r90
  text "PD14" at 103.02,2.849 h1.5 r90
Bottom Overlay:
  drawing of 84 lines, arcs and shapes, not listed
  text "SPI3" at 11.924,95.279 h2 r90
  text "Designed by SAMY VE & VY TRAN" at 142.283,91.928 h3.5
  text "SPI3" at 69.219,85.494 h2 r90
  text "USART2" at 11.924,83.705 h2 r90
  text "I2C1" at 11.924,75.069 h2 r90
  text "USART1" at 69.219,73.831 h2 r90
  text "I2C3" at 69.219,65.068 h2 r90